# Altium PCB pyBehaviorLab_breakout_board.PcbDoc (part 4 of 4)
Units mm, origin at the board's own origin, x right, y up, seen from the top; angles counter-clockwise.
Board outline 190.01 x 159.89 mm, 2 copper layers (Top Layer, Bottom Layer); 146 components, 148 nets, 758 pads, 634 vias.
Unrouted connection lines stored in the file: 29.
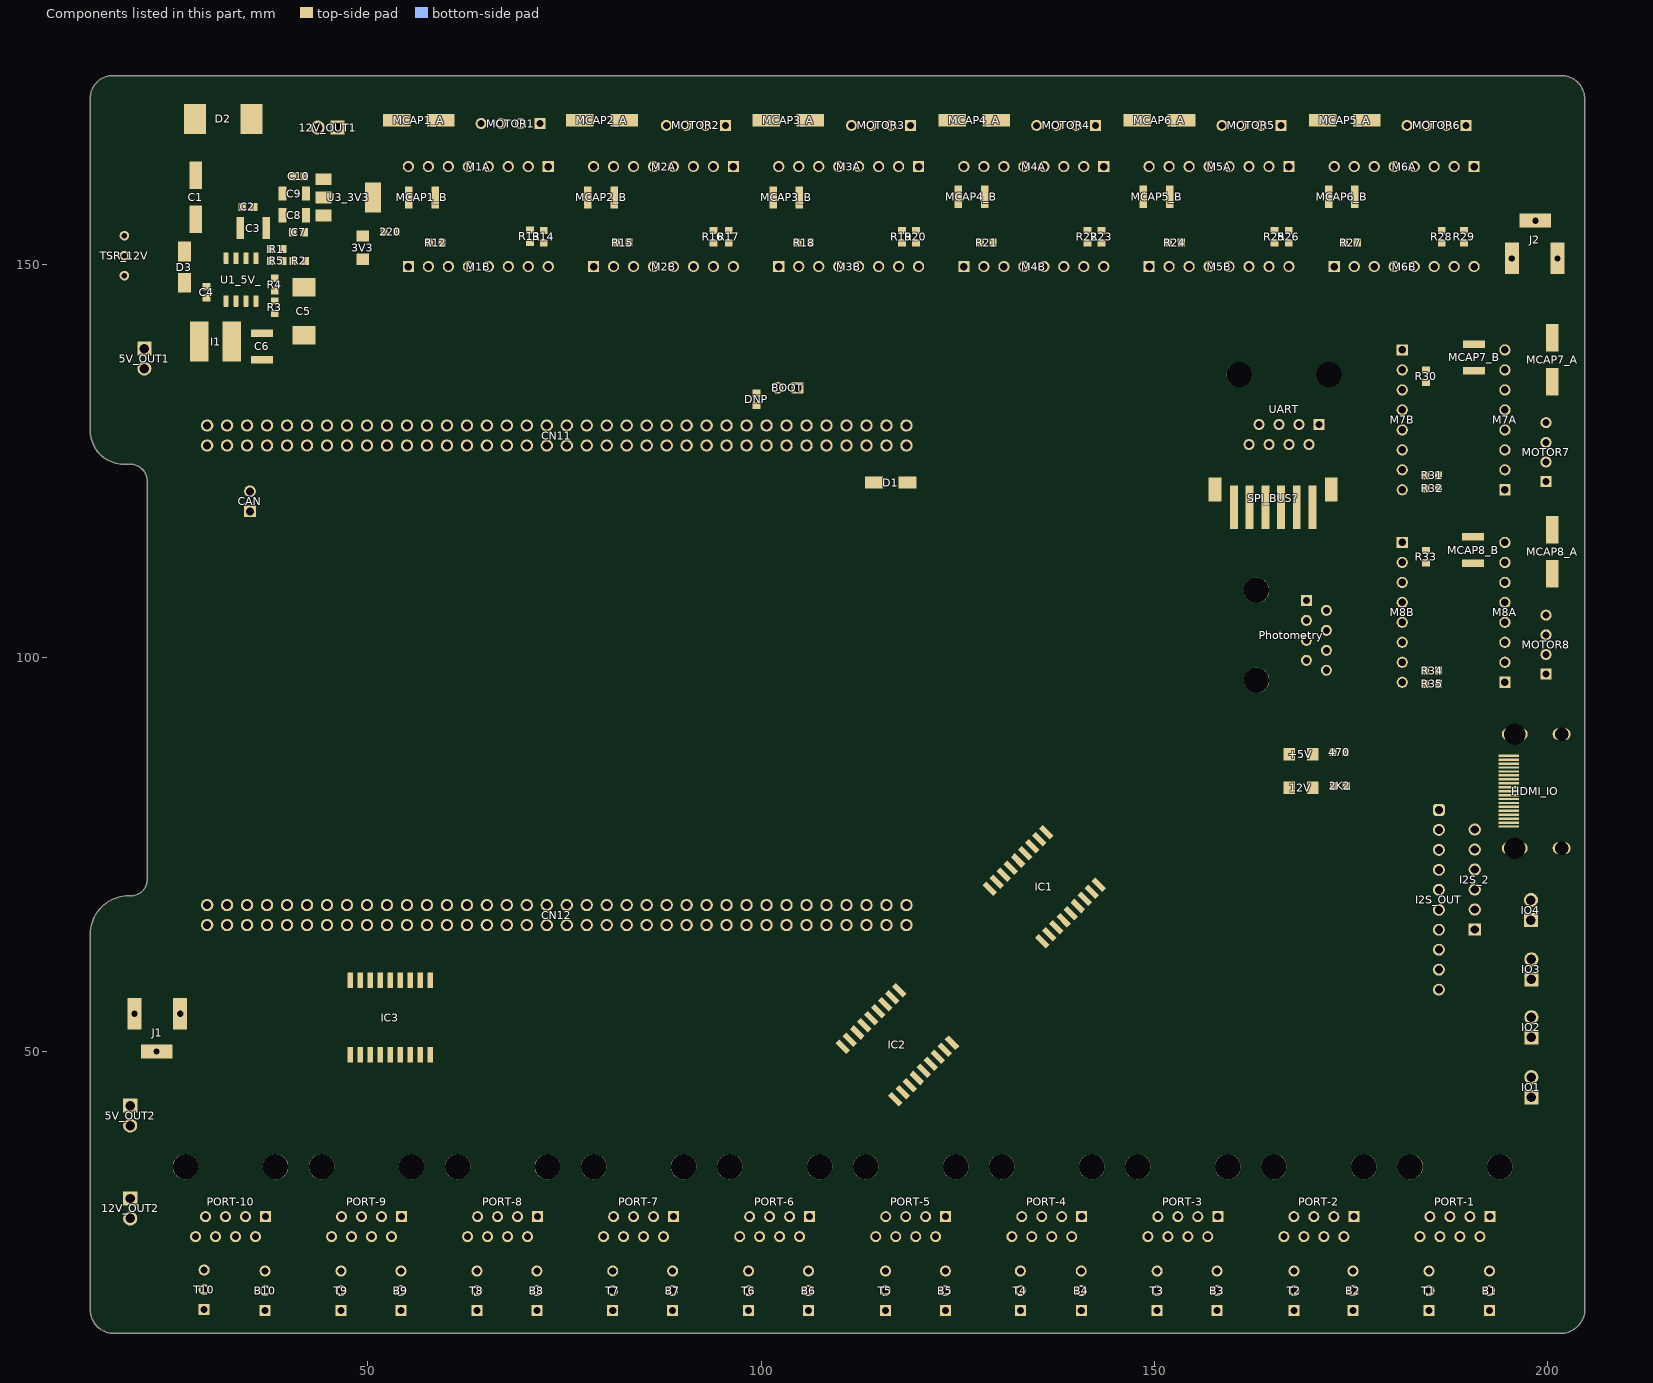
[diagram p3: the components of this part, seen from the top]

## Silkscreen, mask and mechanical layers (free items; w line width, h text height)
Top Overlay:
  lines w0.2: 159.893,85.598 175.768,85.598 ; 159.893,85.598 159.893,81.28 175.768,81.28 175.768,85.598 ; 159.893,85.598 175.768,85.598 ; 159.893,85.598 159.893,89.916 175.768,89.916 175.768,85.598 ; 24.511,116.713 42.926,116.713 42.926,123.698 24.511,123.698 24.511,116.713 ; 153.416,111.506 173.863,111.506 173.863,124.587 153.416,124.587 153.416,111.506 ; 154.178,90.805 173.863,90.805 173.863,110.998 154.178,110.998 154.178,90.805 ; 154.559,125.984 175.133,125.984 175.133,143.383 154.559,143.383 154.559,125.984
  lines w0.25: 24.05,61.595 153.163,61.595 153.163,134.621 24.05,134.621 24.05,61.595
  lines w0.254: 25.763,20.736 194.8,20.736 ; 25.89,18.196 194.8,18.196
  lines w0.3: 15.409,137.936 24.13,137.936 ; 31.097,134.655 37.828,134.655 44.349,134.73 52.605,143.179 52.594,144.105 ; 44.94,165.881 44.94,171.993 ; 194.945,45.455 204.089,45.455 ; 194.945,53.035 204.089,53.035 ; 194.945,60.441 204.089,60.441 ; 194.945,67.995 204.089,67.995 ; 24.384,145.288 ccw(c25.527,145.288) 25.527,144.145 cw(c25.527,143.002) 26.67,143.002 26.67,142.748 26.67,137.668 ccw(c27.94,137.668) 27.94,136.398 43.561,136.398 ccw(c43.561,137.668) 44.831,137.668 44.831,151.892 ccw(c43.561,151.892) 43.561,153.162 39.37,153.162 cw(c39.37,154.432) 38.1,154.432 38.1,159.512 ccw(c36.83,159.512) 36.83,160.782 33.528,160.782 ccw(c33.528,159.512) 32.258,159.512 32.258,154.813 cw(c30.988,154.813) 30.988,153.543 25.273,153.543 ccw(c25.273,152.654) 24.384,152.654 24.384,145.288 ; 169.926,55.118 ccw(c171.069,55.118) 171.069,53.975 186.944,53.975 ccw(c186.944,55.245) 188.214,55.245 188.214,82.55 ccw(c186.944,82.55) 186.944,83.82 179.578,83.82 ccw(c179.578,82.55) 178.308,82.55 178.308,78.867 cw(c177.038,78.867) 177.038,77.597 171.196,77.597 ccw(c171.196,76.327) 169.926,76.327 169.926,55.118 ; 190.373,91.44 ccw(c191.389,91.44) 191.389,90.424 cw(c191.389,89.154) 192.659,89.154 192.659,75.565 ccw(c193.929,75.565) 193.929,74.295 204.089,74.295 204.089,94.615 ccw(c203.962,94.615) 203.962,94.742 190.881,94.742 ccw(c190.881,94.234) 190.373,94.234 190.373,91.44
  text "12V" at 38.854,172.601 h2.5 r270
  text "GND" at 48.361,171.366 h2 r270
  text "3v3" at 46.655,162.225 h1.1
  text "POWER" at 36.314,162.171 h1.6
  text "12V" at 194.094,157.645 h3
  text "EN" at 54.148,145.761 h1.1
  text "EN" at 101.12,145.761 h1.1
  text "EN" at 124.488,145.761 h1.1
  text "EN" at 148.11,145.761 h1.1
  text "STEP" at 161.699,145.761 h1.1
  text "DIR" at 166.652,145.761 h1.1
  text "EN" at 171.351,145.761 h1.1
  text "<<5V  /   buck" at 44.831,145.542 h1.1
  text "5V buck (DNP)" at 16.845,145.207 h1 r90
  text "EN" at 79.057,145.028 h1.1 r90
  text "DIR" at 73.342,144.111 h1.1 r90
  text "DIR" at 96.964,144.111 h1.1 r90
  text "DIR" at 120.713,144.111 h1.1 r90
  text "DIR" at 144.208,144.111 h1.1 r90
  text "DIR" at 191.452,144.111 h1.1 r90
  text "M6" at 178.723,144.105 h2.54
  text "M1" at 60.934,144.038 h2.54
  text "M2" at 83.921,144.038 h2.54
  text "M3" at 107.73,143.978 h2.54
  text "M4" at 131.606,143.978 h2.54
  text "M5" at 151.672,143.978 h2.54
  text "STEP" at 70.802,142.829 h1.1 r90
  text "STEP" at 94.424,142.829 h1.1 r90
  text "STEP" at 118.427,142.829 h1.1 r90
  text "STEP" at 141.922,142.829 h1.1 r90
  text "STEP" at 188.785,142.829 h1.1 r90
  text "GND" at 15.994,141.343 h2
  text "EN" at 177.193,138.638 h1.1
  text "(Warning) Always diconnect power and USB before inserting /  / removing the stepper-driver" at 49.53,135.255 h1.8
  text "M7" at 175.929,133.714 h2.54 r270
  text "CK" at 115.316,131.826 h1.52
  text "5V" at 16.756,131.564 h3
  text "D2" at 124.587,129.286 h1.52
  text "D3" at 125.603,125.857 h1.52
  text "CMD" at 115.189,124.333 h1.52
  text "STEP" at 174.653,123.144 h1.1
  text "DIR" at 175.901,120.604 h1.1
  text "RX-D0" at 25.265,120.515 h1.5
  text "TX-D1" at 25.265,117.721 h1.5
  text "SPI" at 155.964,117.467 h2 r90
  text "3V3" at 167.686,115.143 h1.2 r270
  text "GND" at 169.718,115.143 h1.1 r270
  text "EN" at 176.939,113.873 h1.1
  text "NUCLEO_breakout_V2" at 61.614,113.255 h2
  text "MISO" at 162.196,112.488 h1.2 r45
  text "NCS" at 156.972,112.311 h1.2 r45
  text "SCK" at 164.973,111.803 h1.2 r45
  text "MOSI" at 159.004,111.676 h1.2 r45
  text "M8" at 175.82,110.819 h2.54 r270
  text "STEP" at 175.034,98.633 h1.1
  text "DIR" at 176.177,96.22 h1.1
  text "Part of pyBehaviorLab / an open source project / Designed by Sampath Kumar / Dennis Kaetzel Lab Ulm University" at 60.706,90.551 h2.5
  text "12V" at 180.201,80.833 h1.5
  text "5V" at 181.451,78.176 h1.5
  text "GND" at 179.951,75.519 h1.5
  text "DIN" at 180.201,72.863 h1.5
  text "LRCLK" at 176.776,70.096 h1.5
  text "S" at 203.843,69.014 h2.2 r90
  text "DOUT" at 175.379,67.556 h1
  text "G" at 203.843,65.458 h2.2 r90
  text "S/BCLK" at 175.452,64.639 h1.5
  text "PDN" at 179.951,62.236 h1.5
  text "S" at 203.843,61.46 h2.2 r90
  text "12V" at 15.532,60.49 h3
  text "SDA" at 179.951,59.579 h1.5
  text "G" at 203.843,57.904 h2.2 r90
  text "SCL" at 179.951,56.923 h1.5
  text "I2S AudioBoard" at 173.336,55.076 h1.6 r90
  text "S" at 203.843,54.054 h2.2 r90
  text "PCM5.->" at 190.508,53.078 h1.6 r90
  text "G" at 203.843,50.498 h2.2 r90
  text "DAC" at 131.192,50.346 h2
  text "ADC" at 182.626,49.657 h2
  text "I2C" at 130.938,47.298 h2
  text "I2C" at 69.089,47.044 h2
  text "DAC" at 61.422,47.015 h2
  text "UART" at 182.645,46.628 h2
  text "S" at 203.843,46.474 h2.2 r90
  text "UART" at 123.463,45.358 h1.2
  text "GND" at 16.683,45.131 h1.6
  text "G" at 203.843,42.918 h2.2 r90
  text "5" at 120.942,42.583 h2.5
  text "5V" at 16.629,36.06 h2.5
  text "GND" at 16.556,33.066 h1.6
  text "12V" at 16.629,24.122 h2.5
  text "BOT" at 197.985,23.106 h1.8
  text "S" at 92.912,22.321 h1.8
  text "S" at 162.127,22.321 h1.8
  text "S" at 41.096,22.194 h1.8
  text "S" at 58.368,22.194 h1.8
  text "S" at 75.64,22.194 h1.8
  text "S" at 110.184,22.194 h1.8
  text "S" at 127.71,22.194 h1.8
  text "S" at 144.855,22.194 h1.8
  text "S" at 179.399,22.194 h1.8
  text "G" at 92.912,18.638 h1.8
  text "G" at 162.127,18.638 h1.8
  text "G" at 41.096,18.511 h1.8
  text "G" at 58.368,18.511 h1.8
  text "G" at 75.64,18.511 h1.8
  text "G" at 110.184,18.511 h1.8
  text "G" at 127.71,18.511 h1.8
  text "G" at 144.855,18.511 h1.8
  text "G" at 179.399,18.511 h1.8
  text "TOP" at 24.882,17.045 h1.8 r90
  text "P" at 92.965,14.917 h1.8
  text "P" at 162.18,14.917 h1.8
  text "P" at 41.149,14.79 h1.8
  text "P" at 58.421,14.79 h1.8
  text "P" at 75.693,14.79 h1.8
  text "P" at 110.237,14.79 h1.8
  text "P" at 127.763,14.79 h1.8
  text "P" at 144.908,14.79 h1.8
  text "P" at 179.452,14.79 h1.8
Bottom Overlay:
  text "Part of pyBehaviorLab / an open source project / Designed by Sampath Kumar / Dennis Kaetzel Lab Ulm University" at 119.507,77.978 h2.5
Mechanical 1:
  lines w0.5: 204.706,171.05 ccw(c201.732,171.05) 201.732,174.025 17.598,174.025 ccw(c17.598,171.141) 14.714,171.141 14.714,128.886 ccw(c18.978,128.886) 18.978,124.622 19.8,124.622 cw(c19.8,122.468) 21.953,122.468 21.953,71.811 cw(c19.899,71.811) 19.899,69.758 19.615,69.758 ccw(c19.615,64.857) 14.714,64.857 14.714,17.688 14.714,17.114 ccw(c17.697,17.114) 17.697,14.132 201.648,14.132 ccw(c201.648,17.205) 204.722,17.205 cw(c204.722,17.222) 204.706,17.222 204.706,171.069

## Text inside footprints (layer, text, board x,y; h text height)
TSR_12V: Top Overlay "*" at 18.415,159.927 h0 r270; Top 3D Body "*" at 18.415,158.657 h0 r270